# Altium PCB PD_BQ_Ref_Design_PCB.PcbDoc (part 3 of 4)
Units mil, origin at the board's own origin, x right, y up, seen from the top; angles counter-clockwise.
Board outline 2000 x 3702.76 mil, 4 copper layers (Top Layer, Signal Layer 1, Signal Layer 2, Bottom Layer), stack 61.2 mil thick; 124 components, 53 nets, 359 pads, 494 vias.
Unrouted connection lines stored in the file: 227.
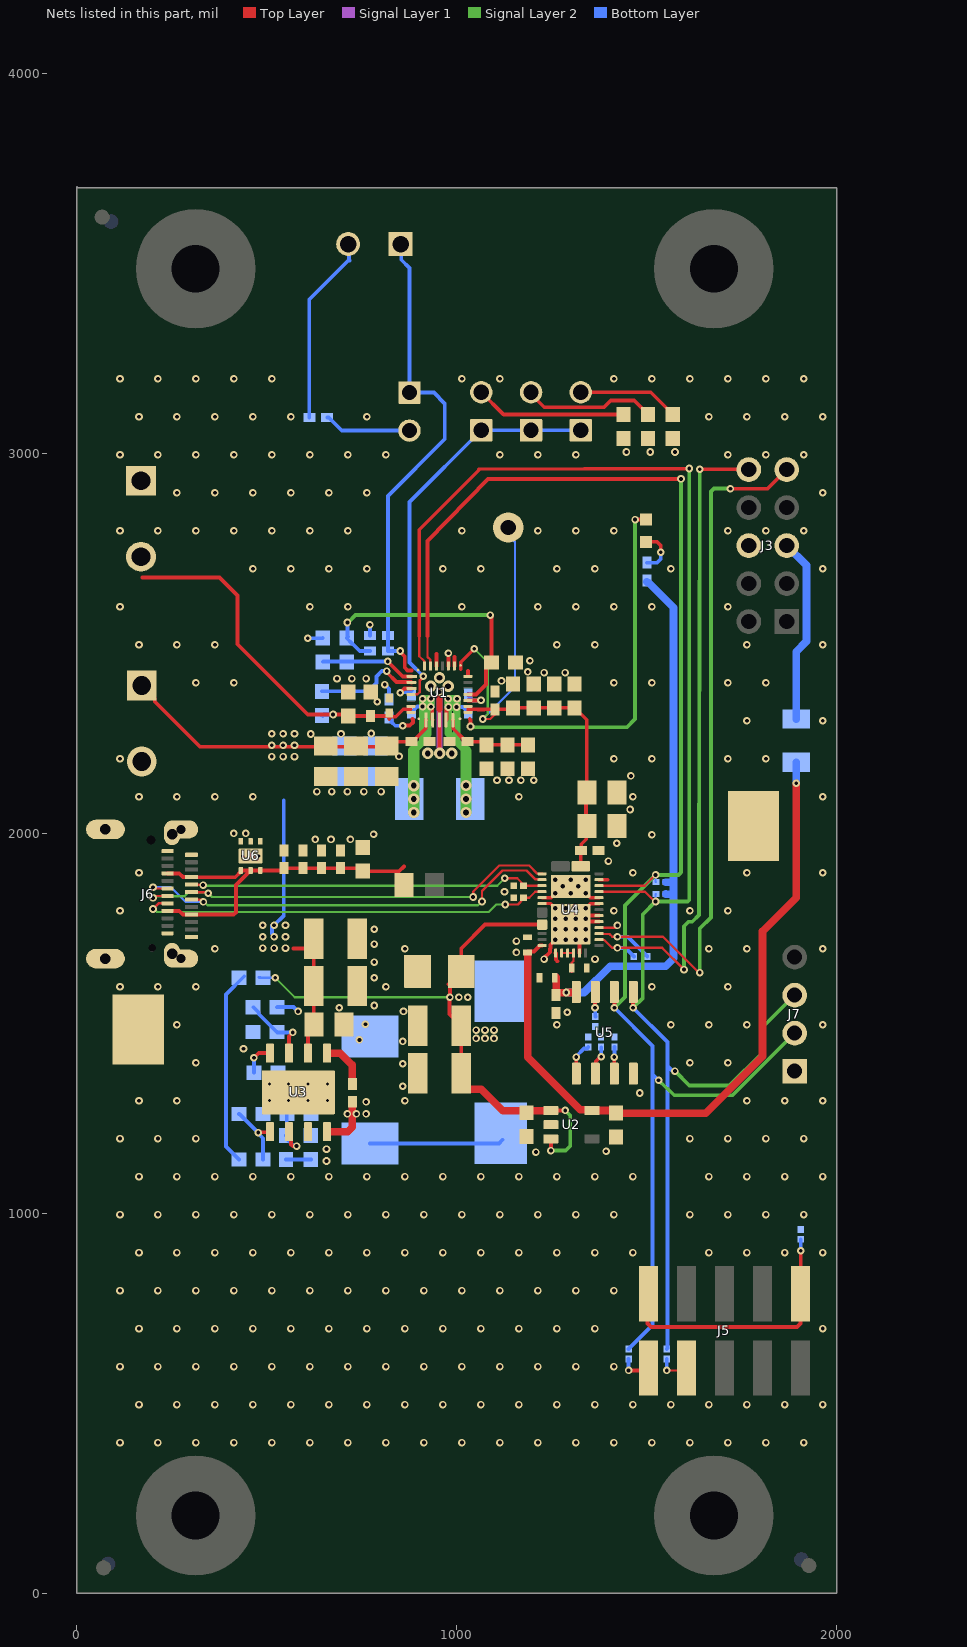
[diagram p4: the nets of this part, all layers, seen from the top]

## Part data (continued)
NT1: library part CMP-0078142-3, "Single point connection between nets.", Manufacturer=N/A, CompType=Net-Tie, MountType=SMT, PackageReference=N/A, PartNumber=N/A
R1: library part CMP-0022736-4, "RES, 100, 1%, 0.1 W, 0603", Manufacturer=Yageo, Power_W=100mW, Supplier Part Number 1=311-100HRCT-ND, TempCo="100 ppm/C", Tolerance_%=1%, Value2=0.1W, Value_Code=100R, ValueDisplayed=100, AEC Category=Q200, AEC Grade=N/A, AEC Qualified=N, ComponentLink1Description="Datasheet link", ComponentLink1URL=http://www.yageo.com/pdf/Pu-RC0603_51_PbFree_L_2.pdf, CompType=Resistor, EIA_Code=E96, MountType=SMT, PackageReference=0603, PartNumber=RC0603FR-07100RL, Res_ohm=100, RoHS=Y, SizeArea_mm2=1.28, SizeAreaWB_mm2=4.68, SizeX_mm=1.6, SizeY_mm=0.8, SizeZ_mm=1, Supplier 1=Digi-Key, Supplier 2=Mouser, Supplier 3=Farnell, Supplier Part Number 2=603-RC0603FR-07100RL, Supplier Part Number 3=9238360, Technology="Thick Film", Value1=1%, VDC_V=75V
R2: library part CMP-0026232-2, "RES, 2.21 k, 1%, 0.063 W, AEC-Q200 Grade 0, 0402", Manufacturer=Vishay-Dale, Power_W=63mW, Supplier Part Number 1=541-2.21KLCT-ND, TempCo="100 ppm/C", Tolerance_%=1%, Value2=0.063W, Value_Code=2k21, ValueDisplayed=2.21k, AEC Category=Q200, AEC Grade=0, AEC Qualified=Y, ComponentLink1Description="Datasheet link", ComponentLink1URL=http://www.vishay.com/docs/20035/dcrcwe3.pdf, CompType=Resistor, EIA_Code=E96, MountType=SMT, PackageReference=0402, PartNumber=CRCW04022K21FKED, Res_ohm=2.21k, RoHS=E, SizeArea_mm2=0.5, SizeX_mm=1, SizeY_mm=0.5, SizeZ_mm=0.6, Supplier 1=Digi-Key, Supplier 2=Newark, Supplier 3=Mouser, Supplier Part Number 2=52K6795, Supplier Part Number 3=71-CRCW0402-2.21K-E3, Technology="Thick Film", Value1=1%, VDC_V=50V
R3: library part CMP-0026464-2, "RES, 5.23 k, 1%, 0.063 W, AEC-Q200 Grade 0, 0402", Manufacturer=Vishay-Dale, PartNumber=CRCW04025K23FKED, Power_W=63mW, Supplier Part Number 1=541-5.23KLCT-ND, TempCo="100 ppm/C", Tolerance_%=1%, Value2=0.063W, Value_Code=5k23, ValueDisplayed=5.23k, AEC Category=Q200, AEC Grade=0, AEC Qualified=Y, ComponentLink1Description="Datasheet link", ComponentLink1URL=http://www.vishay.com/docs/20035/dcrcwe3.pdf, CompType=Resistor, EIA_Code=E96, MountType=SMT, PackageReference=0402, Res_ohm=5.23k, RoHS=E, SizeArea_mm2=0.5, SizeX_mm=1, SizeY_mm=0.5, SizeZ_mm=0.6, Supplier 1=Digi-Key, Supplier 2=Newark, Supplier 3=Mouser, Supplier Part Number 2=52K7121, Supplier Part Number 3=71-CRCW0402-5.23K-E3, Technology="Thick Film", Value1=1%, VDC_V=50V
R4: library part CMP-0022788-4, "RES, 137 k, 1%, 0.1 W, 0603", Manufacturer=Yageo, Power_W=100mW, Supplier Part Number 1=311-137KHRCT-ND, TempCo="100 ppm/C", Tolerance_%=1%, Value2=0.1W, Value_Code=137k, AEC Category=Q200, AEC Grade=N/A, AEC Qualified=N, ComponentLink1Description="Datasheet link", ComponentLink1URL=http://www.yageo.com/pdf/Pu-RC0603_51_PbFree_L_2.pdf, CompType=Resistor, EIA_Code=E96, MountType=SMT, PackageReference=0603, PartNumber=RC0603FR-07137KL, Res_ohm=137k, RoHS=Y, SizeArea_mm2=1.28, SizeAreaWB_mm2=4.68, SizeX_mm=1.6, SizeY_mm=0.8, SizeZ_mm=1, Supplier 1=Digi-Key, Supplier 2=Mouser, Supplier 3=Farnell, Supplier Part Number 2=603-RC0603FR-07137KL, Supplier Part Number 3=1799325, Technology="Thick Film", Value1=1%, ValueDisplayed=137k, VDC_V=75V
R5: library part CMP-0026284-2, "RES, 30.1 k, 1%, 0.063 W, AEC-Q200 Grade 0, 0402", Manufacturer=Vishay-Dale, PartNumber=CRCW040230K1FKED, Power_W=63mW, Supplier Part Number 1=541-30.1KLCT-ND, TempCo="100 ppm/C", Tolerance_%=1%, Value2=0.063W, Value_Code=30k1, ValueDisplayed=30.1k, AEC Category=Q200, AEC Grade=0, AEC Qualified=Y, ComponentLink1Description="Datasheet link", ComponentLink1URL=http://www.vishay.com/docs/20035/dcrcwe3.pdf, CompType=Resistor, EIA_Code=E96, MountType=SMT, PackageReference=0402, Res_ohm=30.1k, RoHS=E, SizeArea_mm2=0.5, SizeX_mm=1, SizeY_mm=0.5, SizeZ_mm=0.6, Supplier 1=Digi-Key, Supplier 2=Newark, Supplier 3=Mouser, Supplier Part Number 2=52K6954, Supplier Part Number 3=71-CRCW0402-30.1K-E3, Technology="Thick Film", Value1=1%, VDC_V=50V
R6: library part CMP-0022735-5, "RES, 100 k, 1%, 0.1 W, 0603", Manufacturer=Yageo, Power_W=100mW, Supplier Part Number 1=311-100KHRCT-ND, TempCo="100 ppm/C", Tolerance_%=1%, Value2=0.1W, Value_Code=100k, AEC Category=Q200, AEC Grade=N/A, AEC Qualified=N, ComponentLink1Description="Datasheet link", ComponentLink1URL=http://www.yageo.com/pdf/Pu-RC0603_51_PbFree_L_2.pdf, CompType=Resistor, EIA_Code=E96, MountType=SMT, PackageReference=0603, PartNumber=RC0603FR-07100KL, Res_ohm=100k, RoHS=Y, SizeArea_mm2=1.28, SizeAreaWB_mm2=4.68, SizeX_mm=1.6, SizeY_mm=0.8, SizeZ_mm=1, Supplier 1=Digi-Key, Supplier 2=Mouser, Supplier 3=Farnell, Supplier Part Number 2=603-RC0603FR-07100KL, Supplier Part Number 3=9238727, Technology="Thick Film", Value1=1%, ValueDisplayed=100k, VDC_V=75V
R7: library part CMP-0025958-3, "RES, 10.0 k, 1%, 0.063 W, AEC-Q200 Grade 0, 0402", Manufacturer=Vishay-Dale, PartNumber=CRCW040210K0FKED, Power_W=63mW, Supplier Part Number 1=541-10.0KLCT-ND, TempCo="100 ppm/C", Tolerance_%=1%, Value2=0.063W, Value_Code=10k0, ValueDisplayed=10.0k, AEC Category=Q200, AEC Grade=0, AEC Qualified=Y, ComponentLink1Description="Datasheet link", ComponentLink1URL=http://www.vishay.com/docs/20035/dcrcwe3.pdf, CompType=Resistor, EIA_Code=E96, MountType=SMT, PackageReference=0402, Res_ohm=10k, RoHS=E, SizeArea_mm2=0.5, SizeX_mm=1, SizeY_mm=0.5, SizeZ_mm=0.6, Supplier 1=Digi-Key, Supplier 2=Newark, Supplier 3=Mouser, Supplier Part Number 2=52K6595, Supplier Part Number 3=71-CRCW0402-10K-E3, Technology="Thick Film", Value1=1%, VDC_V=50V
R8: library part CMP-0023246-5, "RES, 6.04 k, 1%, 0.1 W, 0603", Manufacturer=Yageo, Power_W=100mW, Supplier Part Number 1=311-6.04KHRCT-ND, TempCo="100 ppm/C", Tolerance_%=1%, Value2=0.1W, Value_Code=6k04, ValueDisplayed=6.04k, AEC Category=Q200, AEC Grade=N/A, AEC Qualified=N, ComponentLink1Description="Datasheet link", ComponentLink1URL=http://www.yageo.com/pdf/Pu-RC0603_51_PbFree_L_2.pdf, CompType=Resistor, EIA_Code=E96, MountType=SMT, PackageReference=0603, PartNumber=RC0603FR-076K04L, Res_ohm=6.04k, RoHS=Y, SizeArea_mm2=1.28, SizeAreaWB_mm2=4.68, SizeX_mm=1.6, SizeY_mm=0.8, SizeZ_mm=1, Supplier 1=Digi-Key, Supplier 2=Mouser, Supplier 3=Farnell, Supplier Part Number 2=603-RC0603FR-076K04L, Supplier Part Number 3=9238581, Technology="Thick Film", Value1=1%, VDC_V=75V
R9: library part CMP-0022000-4, "RES, 10.5 k, 1%, 0.1 W, AEC-Q200 Grade 0, 0603", Manufacturer=Vishay-Dale, Power_W=100mW, Supplier Part Number 1=541-10.5KHCT-ND, TempCo="100 ppm/C", Tolerance_%=1%, Value2=0.1W, Value_Code=10k5, ValueDisplayed=10.5k, AEC Category=Q200, AEC Grade=0, AEC Qualified=Y, ComponentLink1Description="Datasheet link", ComponentLink1URL=http://www.vishay.com/docs/20035/dcrcwe3.pdf, CompType=Resistor, EIA_Code=E96, MountType=SMT, PackageReference=0603, PartNumber=CRCW060310K5FKEA, Res_ohm=10.5k, RoHS=E, SizeArea_mm2=1.28, SizeX_mm=1.6, SizeY_mm=0.8, SizeZ_mm=1, Supplier 1=Digi-Key, Supplier 2=Newark, Supplier 3=Mouser, Supplier Part Number 2=52K8068, Supplier Part Number 3=71-CRCW0603-10.5K-E3, Technology="Thick Film", Value1=1%, VDC_V=75V
R10: library part CMP-0022089-4, "RES, 17.4 k, 1%, 0.1 W, AEC-Q200 Grade 0, 0603", Manufacturer=Vishay-Dale, Power_W=100mW, Supplier Part Number 1=541-17.4KHCT-ND, TempCo="100 ppm/C", Tolerance_%=1%, Value2=0.1W, Value_Code=17k4, ValueDisplayed=17.4k, AEC Category=Q200, AEC Grade=0, AEC Qualified=Y, ComponentLink1Description="Datasheet link", ComponentLink1URL=http://www.vishay.com/docs/20035/dcrcwe3.pdf, CompType=Resistor, EIA_Code=E96, MountType=SMT, PackageReference=0603, PartNumber=CRCW060317K4FKEA, Res_ohm=17.4k, RoHS=E, SizeArea_mm2=1.28, SizeX_mm=1.6, SizeY_mm=0.8, SizeZ_mm=1, Supplier 1=Digi-Key, Supplier 2=Newark, Supplier 3=Mouser, Supplier Part Number 2=52K8186, Supplier Part Number 3=71-CRCW0603-17.4K-E3, Technology="Thick Film", Value1=1%, VDC_V=75V
R11: library part CMP-0017299-3, "RES, 10.0, 1%, 0.25 W, AEC-Q200 Grade 0, 1206", Manufacturer=Panasonic, Power_W=250mW, Supplier Part Number 1=P10.0FCT-ND, TempCo="100 ppm/C", Tolerance_%=1%, Value2=0.25W, Value_Code=10R0, ValueDisplayed=10.0, AEC Category=Q200, AEC Grade=0, AEC Qualified=Y, ComponentLink1Description="Datasheet link", ComponentLink1URL=https://industrial.panasonic.com/cdbs/www-data/pdf/RDA0000/AOA0000C304.pdf, CompType=Resistor, EIA_Code=E96, MountType=SMT, PackageReference=1206, PartNumber=ERJ-8ENF10R0V, Res_ohm=10, RoHS=Y, SizeArea_mm2=5.12, SizeAreaWB_mm2=10.92, SizeX_mm=3.2, SizeY_mm=1.6, SizeZ_mm=1.35, Supplier 1=Digi-Key, Supplier 2=Farnell, Supplier Part Number 2=1748406, Technology="Thick Film", Value1=1%, VDC_V=200V
R12: library part CMP-0022483-4, "RES, 51.1, 1%, 0.1 W, AEC-Q200 Grade 0, 0603", Manufacturer=Vishay-Dale, Power_W=100mW, Supplier Part Number 1=541-51.1HCT-ND, TempCo="100 ppm/C", Tolerance_%=1%, Value2=0.1W, Value_Code=51R1, ValueDisplayed=51.1, AEC Category=Q200, AEC Grade=0, AEC Qualified=Y, ComponentLink1Description="Datasheet link", ComponentLink1URL=http://www.vishay.com/docs/20035/dcrcwe3.pdf, CompType=Resistor, EIA_Code=E96, MountType=SMT, PackageReference=0603, PartNumber=CRCW060351R1FKEA, Res_ohm=51.1, RoHS=E, SizeArea_mm2=1.28, SizeX_mm=1.6, SizeY_mm=0.8, SizeZ_mm=1, Supplier 1=Digi-Key, Supplier 2=Newark, Supplier 3=Mouser, Supplier Part Number 2=52K8594, Supplier Part Number 3=71-CRCW0603-51.1-E3, Technology="Thick Film", Value1=1%, VDC_V=75V
R13: library part CMP-0022546-4, "RES, 665 k, 1%, 0.1 W, AEC-Q200 Grade 0, 0603", Manufacturer=Vishay-Dale, Power_W=100mW, Supplier Part Number 1=541-665KHCT-ND, TempCo="100 ppm/C", Tolerance_%=1%, Value2=0.1W, Value_Code=665k, AEC Category=Q200, AEC Grade=0, AEC Qualified=Y, ComponentLink1Description="Datasheet link", ComponentLink1URL=http://www.vishay.com/docs/20035/dcrcwe3.pdf, CompType=Resistor, EIA_Code=E96, MountType=SMT, PackageReference=0603, PartNumber=CRCW0603665KFKEA, Res_ohm=665k, RoHS=E, SizeArea_mm2=1.28, SizeX_mm=1.6, SizeY_mm=0.8, SizeZ_mm=1, Supplier 1=Digi-Key, Supplier 2=Mouser, Supplier 3=Farnell, Supplier Part Number 2=71-CRCW0603-665K-E3, Supplier Part Number 3=1157478, Technology="Thick Film", Value1=1%, ValueDisplayed=665k, VDC_V=75V
R14: library part CMP-0021999-4, "RES, 10.2 k, 1%, 0.1 W, AEC-Q200 Grade 0, 0603", Manufacturer=Vishay-Dale, Power_W=100mW, Supplier Part Number 1=541-10.2KHCT-ND, TempCo="100 ppm/C", Tolerance_%=1%, Value2=0.1W, Value_Code=10k2, ValueDisplayed=10.2k, AEC Category=Q200, AEC Grade=0, AEC Qualified=Y, ComponentLink1Description="Datasheet link", ComponentLink1URL=http://www.vishay.com/docs/20035/dcrcwe3.pdf, CompType=Resistor, EIA_Code=E96, MountType=SMT, PackageReference=0603, PartNumber=CRCW060310K2FKEA, Res_ohm=10.2k, RoHS=E, SizeArea_mm2=1.28, SizeX_mm=1.6, SizeY_mm=0.8, SizeZ_mm=1, Supplier 1=Digi-Key, Supplier 2=Newark, Supplier 3=Mouser, Supplier Part Number 2=52K8067, Supplier Part Number 3=71-CRCW0603-10.2K-E3, Technology="Thick Film", Value1=1%, VDC_V=75V
R15: library part CMP-0022036-4, "RES, 130 k, 1%, 0.1 W, AEC-Q200 Grade 0, 0603", Manufacturer=Vishay-Dale, Power_W=100mW, Supplier Part Number 1=541-130KHCT-ND, TempCo="100 ppm/C", Tolerance_%=1%, Value2=0.1W, Value_Code=130k, AEC Category=Q200, AEC Grade=0, AEC Qualified=Y, ComponentLink1Description="Datasheet link", ComponentLink1URL=http://www.vishay.com/docs/20035/dcrcwe3.pdf, CompType=Resistor, EIA_Code=E96, MountType=SMT, PackageReference=0603, PartNumber=CRCW0603130KFKEA, Res_ohm=130k, RoHS=E, SizeArea_mm2=1.28, SizeX_mm=1.6, SizeY_mm=0.8, SizeZ_mm=1, Supplier 1=Digi-Key, Supplier 2=Newark, Supplier 3=Mouser, Supplier Part Number 2=52K8127, Supplier Part Number 3=71-CRCW0603-130K-E3, Technology="Thick Film", Value1=1%, ValueDisplayed=130k, VDC_V=75V
R16: library part CMP-0022137-4, "RES, 1.96 k, 1%, 0.1 W, AEC-Q200 Grade 0, 0603", Manufacturer=Vishay-Dale, Power_W=100mW, Supplier Part Number 1=541-1.96KHCT-ND, TempCo="100 ppm/C", Tolerance_%=1%, Value2=0.1W, Value_Code=1k96, ValueDisplayed=1.96k, AEC Category=Q200, AEC Grade=0, AEC Qualified=Y, ComponentLink1Description="Datasheet link", ComponentLink1URL=http://www.vishay.com/docs/20035/dcrcwe3.pdf, CompType=Resistor, EIA_Code=E96, MountType=SMT, PackageReference=0603, PartNumber=CRCW06031K96FKEA, Res_ohm=1.96k, RoHS=E, SizeArea_mm2=1.28, SizeX_mm=1.6, SizeY_mm=0.8, SizeZ_mm=1, Supplier 1=Digi-Key, Supplier 2=Newark, Supplier 3=Mouser, Supplier Part Number 2=52K8051, Supplier Part Number 3=71-CRCW0603-1.96K-E3, Technology="Thick Film", Value1=1%, VDC_V=75V
R17: library part CMP-0022360-4, "RES, 37.4 k, 1%, 0.1 W, AEC-Q200 Grade 0, 0603", Manufacturer=Vishay-Dale, Power_W=100mW, Supplier Part Number 1=541-37.4KHCT-ND, TempCo="100 ppm/C", Tolerance_%=1%, Value2=0.1W, Value_Code=37k4, ValueDisplayed=37.4k, AEC Category=Q200, AEC Grade=0, AEC Qualified=Y, ComponentLink1Description="Datasheet link", ComponentLink1URL=http://www.vishay.com/docs/20035/dcrcwe3.pdf, CompType=Resistor, EIA_Code=E96, MountType=SMT, PackageReference=0603, PartNumber=CRCW060337K4FKEA, Res_ohm=37.4k, RoHS=E, SizeArea_mm2=1.28, SizeX_mm=1.6, SizeY_mm=0.8, SizeZ_mm=1, Supplier 1=Digi-Key, Supplier 2=Newark, Supplier 3=Mouser, Supplier Part Number 2=52K8462, Supplier Part Number 3=71-CRCW0603-37.4K-E3, Technology="Thick Film", Value1=1%, VDC_V=75V
R21 R22 R24 R25: library part CMP-0027272-3, "RES, 2.20 k, 1%, 0.05 W, 0201", Manufacturer=Vishay-Dale, Power_W=50mW, Supplier Part Number 1=541-2.20KAABCT-ND, TempCo="100 ppm/C", Tolerance_%=1%, Value2=0.05W, Value_Code=2k20, ValueDisplayed=2.20k, AEC Category=Q200, AEC Grade=N/A, AEC Qualified=N, ComponentLink1Description="Datasheet link", ComponentLink1URL=http://www.vishay.com/docs/20052/crcw0201e3.pdf, CompType=Resistor, MountType=SMT, PackageReference=0201, PartNumber=CRCW02012K20FKED, Res_ohm=2.2k, RoHS=E, SizeArea_mm2=0.18, SizeX_mm=0.6, SizeY_mm=0.3, SizeZ_mm=0.26, Supplier 1=Digi-Key, Supplier 2=Newark, Supplier 3=Mouser, Supplier Part Number 2=01X1849, Supplier Part Number 3=71-CRCW02012K20FKED, Technology="Thick Film", Value1=1%, VDC_V=30V
R26 R27 R29: library part CMP-0027008-4, "RES, 0, 5%, 0.05 W, 0201", Manufacturer=Vishay-Dale, Power_W=50mW, Supplier Part Number 1=72M6743, TempCo=ppm/C, Tolerance_%=5%, Value2=0.05W, Value_Code=0000, ValueDisplayed=0, AEC Category=Q200, AEC Grade=N/A, AEC Qualified=N, ComponentLink1Description="Datasheet link", ComponentLink1URL=http://www.vishay.com/docs/20052/crcw0201e3.pdf, CompType=Resistor, EIA_Code=E24, MountType=SMT, PackageReference=0201, PartNumber=CRCW02010000Z0ED, Res_ohm=0, RoHS=E, SizeArea_mm2=0.18, SizeX_mm=0.6, SizeY_mm=0.3, SizeZ_mm=0.26, Supplier 1=Newark, Technology="Thick Film", Value1=5%
R28 R30 R31 R32: library part CMP-0027262-3, "RES, 10.0 k, 1%, 0.05 W, 0201", Manufacturer=Vishay-Dale, Power_W=50mW, Supplier Part Number 1=541-10.0KAABCT-ND, TempCo="100 ppm/C", Tolerance_%=1%, Value2=0.05W, Value_Code=10k0, ValueDisplayed=10.0k, AEC Category=Q200, AEC Grade=N/A, AEC Qualified=N, ComponentLink1Description="Datasheet link", ComponentLink1URL=http://www.vishay.com/docs/20052/crcw0201e3.pdf, CompType=Resistor, EIA_Code=E96, MountType=SMT, PackageReference=0201, PartNumber=CRCW020110K0FKED, Res_ohm=10k, RoHS=E, SizeArea_mm2=0.18, SizeX_mm=0.6, SizeY_mm=0.3, SizeZ_mm=0.26, Supplier 1=Digi-Key, Supplier 2=Newark, Supplier 3=Mouser, Supplier Part Number 2=71R4422, Supplier Part Number 3=71-CRCW020110K0FKED, Technology="Thick Film", Value1=1%, VDC_V=30V
SH-J1 SH-J2: library part CMP-0003623-1, "Shunt, 100mil, Gold plated, Black", Alternate Manufacturer=3M, Alternate PartNumber=969102-0000-DA, Manufacturer=Samtec, Supplier Part Number 1=SNT-100-BK-G-ND, ClassName=Shunt, ComponentLink1Description="Datasheet Link", ComponentLink1URL=http://www.samtec.com/ftppub/pdf/SNT.PDF, CompType=Shunt, Key=SNT-100-BK-G, LatestRevisionDate=2017-03-09, MountType=N/A, Note="You can \"mate\" this to a header by matching the designator.  i.e. use SH-J3 for header J3", PackageReference=Shunt, PartNumber=SNT-100-BK-G, Publisher="Texas Instruments", RoHS=Y, Supplier 1=Digi-Key
TP1: library part CMP-0055137-1, "Test Point, Miniature, Red, TH", Color=Red, Manufacturer=Keystone, Supplier Part Number 1=36-5000-ND, CNHeader=FALSE, ComponentLink1Description="Datasheet URL", ComponentLink1URL=http://www.keyelco.com/userAssets/file/M60-2p60.pdf, CompType="Test Point", ContactFinish=Silver, CT=TRUE, Green_EU RoHS=Passed, Green_EU RoHS-2=Incomplete, Green_Lifecycle=Active, Green_REACh=Passed, LatestRevisionDate=26/05/2017, MountType=TH, PackageReference="Red Miniature Testpoint", PartNumber=5000, Publisher="Texas Instruments", RoHS=Y, Supplier 1=Digi-Key, Supplier 2=Mouser, Supplier Part Number 2=534-5000
TP2 TP3: library part CMP-0055153-1, "Test Point, Compact, SMT", Manufacturer=Keystone, Supplier Part Number 1=36-5016TR-ND, CNHeader=FALSE, ComponentLink1Description="Datasheet URL", ComponentLink1URL=http://www.keyelco.com/userAssets/store/files/5016.PDF, CompType="Test Point", CT=TRUE, Green_EU RoHS=Passed, Green_EU RoHS-2=Incomplete, Green_Lifecycle=Active, Green_REACh=Passed, LatestRevisionDate=26/05/2017, MountType=SMT, PackageReference=Testpoint_Keystone_Compact, PartNumber=5016, Publisher="Texas Instruments", RoHS=Y, Supplier 1=Digi-Key, Supplier 2=Mouser, Supplier Part Number 2=534-5016
U1: library part CMP-0088656-1, "BQ2579x HotRod", Manufacturer="Texas Instruments", Operating Temperature Range=to, Datasheet Path=datasheets/IC-BQ25792RQM.pdf, helpURL=https://upverter.com/upn/revision/94d0648e55e6c5c0/, PackageReference=VQFN-HR29, Part Number=BQ25792RQM, PartNumber=BQ25792RQM, RoHS=UNKNOWN, SizeZ_mm=1mm, Standoff Height=0mm
U2: library part CMP-0074640-3, "500-mA, Low IQ, Small Size, Low Dropout Regulator, DBV0005A (SOT-23-5)", Alternate Manufacturer="Texas Instruments", AEC Category=Q200, AEC Qualified=N, ComponentLink1Description="Datasheet Link", ComponentLink1URL=http://www.ti.com/lit/ds/symlink/tlv755p.pdf, ComponentLink2Description="Product Folder", ComponentLink2URL=http://www.ti.com/product/tlv755p, ComponentLink3Description="Online Datasheet", ComponentLink3URL=http://www.ti.com/product/tlv755p/datasheet, CompType=IC, Manufacturer="Texas Instruments", MountType=SMT, PackageDescription=SOT-23-5, PackageReference=DBV0005A, PartNumber=TLV75533PDBVR, SizeArea_mm2=8.12, SizeAreaWB_mm2=14.82, SizeX_mm=2.8, SizeY_mm=2.9, SizeZ_mm=1.45
U3: library part CMP-0067056-2, "3.5V to 28V Input, 5A, 570kHz Step-Down Converter with Eco-mode, DDA0008E (SOIC-8)", Alternate Manufacturer="Texas Instruments", Alternate PartNumber=TPS54531DDA, ComponentLink1Description="Datasheet Link", ComponentLink1URL=http://www.ti.com/lit/ds/symlink/tps54531.pdf, CompType=IC, Green_EU RoHS=Passed, Green_EU RoHS-2=Passed, Green_Lifecycle=Active, Green_REACh=Passed, LatestRevisionDate=2017-06-09, Manufacturer="Texas Instruments", MountType=SMT, PackageDescription=SOIC-8, PackageReference=DDA0008E, PartNumber=TPS54531DDAR, Publisher="Texas Instruments", RoHS=Y, SizeArea_mm2=31.0, SizeAreaWB_mm2=57.4, SizeX_mm=5.0, SizeY_mm=6.2, SizeZ_mm=1.7, U/M=EA
U4: library part CMP-0090338-5, "USB Type-C and USB PD Controller with Integrated Power Switches Optimized for Power Applications", Manufacturer="Texas Instruments", Max Supply Voltage=22V, Min Supply Voltage=3V, Operating Temperature Range="-40°C to +125°C", AEC Category=Q200, AEC Qualified=No, ComponentLink1Description="Datasheet Link", ComponentLink1URL=http://www.ti.com/lit/ds/symlink/GPN.pdf, ComponentLink2Description="Product Folder", ComponentLink2URL=http://www.ti.com/product/GPN, ComponentLink3Description="Online Datasheet", ComponentLink3URL=http://www.ti.com/product/GPN/datasheet, CompType=IC, Datasheet Path=datasheets/IC-TPS25750DRJK.pdf, helpURL=https://upverter.com/upn/revision/5be88369cac593dc/, Number Of Ports=1, PackageReference=VQFN32, Part Number=TPS25750DRJK, PartNumber=TPS25750DRJK, RoHS=UNKNOWN, SizeZ_mm=0.8mm, Standoff Height=0mm, TaMax_C=+105°C, TaMin_C=-40°C, Tjmax_C=+175°C, Usb Standard="USB 3.0"
U5: library part CMP-0005314-2, "256 kb I2C CMOS Serial EEPROM, SOIC-8", Manufacturer="ON Semiconductor", Supplier Part Number 1=CAT24C256WI-G-ND, ComponentLink1Description="Datasheet URL", ComponentLink1URL=http://www.onsemi.com/pub_link/Collateral/CAT24C256-D.PDF, LatestRevisionDate=09/03/2017, MountType=SMT, PackageReference=SOIC-8, PartNumber=CAT24C256WI-G, Publisher="Texas Instruments", RoHS=Y, SizeArea_mm2=29.351, SizeAreaWB_mm2=55.131, SizeX_mm=5.99, SizeY_mm=4.9, SizeZ_mm=1.75, Supplier 1=Digi-Key, Supplier 2=Newark, Supplier 3=Mouser, Supplier Part Number 2=06R0552, Supplier Part Number 3=698-CAT24C256WI-G
U6: library part CMP-0077834-1, "22-V Precision Surge Protection Clamp, DRV0006A (WSON-6)", Alternate Manufacturer="Texas Instruments", AEC Category=Q200, AEC Qualified=N, ComponentLink1Description="Datasheet Link", ComponentLink1URL=http://www.ti.com/lit/ds/symlink/tvs3300.pdf, ComponentLink2Description="Product Folder", ComponentLink2URL=TBD, CompType=IC, Manufacturer="Texas Instruments", MountType=SMT, PackageDescription=WSON-6, PackageReference=DRV0006A, PartNumber=TVS2200DRVR, SizeArea_mm2=4.0, SizeAreaWB_mm2=9.0, SizeX_mm=2.0, SizeY_mm=2.0, SizeZ_mm=0.8
ZZ1: library part CMP-0003616-3, ClassName=AssemblyNote, CompType=AssemblyNote, Key=AssemblyNoteLabel, LatestRevisionDate=2017-03-09, Publisher="Texas Instruments"

## Via types
v1: diameter 20, hole 10, Top Layer to Bottom Layer, tented both sides, 445 vias
v2: diameter 23.62, hole 11.81, Top Layer to Bottom Layer, 24 vias
v3: diameter 30, hole 15, Top Layer to Bottom Layer, tented both sides, 12 vias
v4: diameter 19.68, hole 7.87, Top Layer to Bottom Layer, tented both sides, 10 vias
v5: diameter 20, hole 10, Top Layer to Bottom Layer, 3 vias

## Nets (pads, with @x,y where several pads share a name; then routed paths per layer and width w, separated by ;. In a path a pad name is that pad's centre, name@x,y a point inside that pad or via, vN(x,y) a via of type N, cw(c..) or ccw(c..) an arc to the next point about the centre after c; other vN are vias at no path point)
AGND: C22.2 J3.6 J4.2 NT1.2 R5.1 R6.1 R7.1 R8.1 R9.1 R10.1 U1.10 U1.11 U1.13 | length 694.3
  Top Layer w10: 946.85,2472.44 946.97,2472.32 U1.13@946.97,2440.84 ; 978.35,2462.6 978.35,2440.96 U1.11@978.46,2440.84 ; 994.09,2464.57 994.21,2464.45 U1.10@994.21,2440.84
  Bottom Layer w10: v1(608.27,2513.78) 646.84,2513.78 R6.1@647.82,2514.76 ; R7.1@612.2,3094.49 612.2,3405.51 692.91,3486.22 693.03,3486.22 714.68,3507.87 718.5,3507.87 716.54,3509.84 716.54,3549.21 J4.2@714.57,3551.18 ; v1(771.65,2549.21) 771.65,2520.79 R5.1@771.77,2520.67 ; v1(811.02,2391.73) 821.97,2380.79 C22.2@821.97,2352.36
  other v1: 978.35,2474.41 1446.85,3003.94 1509.84,3003.94 1574.8,3003.94
BAT: C19.1 C20.1 C21.1 J2.2 R1.1 U1.22 U1.23 | length 977.6
  Top Layer w10: 173.23,2673.62 375.59,2673.62 423.23,2625.98 423.23,2498.03 608.27,2312.99 v1(674.83,2312.99) 710.75,2312.99 C21.1@714.68,2309.06 C20.1@773.74,2309.06 817.05,2309.06 822.95,2303.15 ; 822.95,2301.18 822.95,2303.15 ; 879.05,2326.77 859.37,2326.77 839.8,2307.2 827,2307.2 822.95,2303.15
  Bottom Layer w10: R1.1@645.67,2311.02 647.64,2309.06 651.57,2312.99 v1(674.83,2312.99)
C_CC1: C42.1 J6.A5 U4.28 | length 942.2
  Top Layer w6: J6.A5@302.17,1865.16 302.66,1864.67 332.19,1864.67 v1(332.68,1864.17) ; v1(1126.77,1881.89) 1159.35,1881.89 1176.38,1864.86 C42.1@1176.38,1862.2 1225.02,1862.2 U4.28@1225.2,1862.39
  Signal Layer 2 w6: v1(332.68,1864.17) 334.65,1862.2 1107.09,1862.2 v1(1126.77,1881.89)
C_CC2: C41.1 J6.B5 U4.29 | length 1095.8
  Top Layer w6: v1(200.79,1801.18) 215.55,1815.95 J6.B5@239.17,1815.95 ; v1(1127.95,1812.99) 1161.31,1812.99 1176.38,1828.06 C41.1@1176.38,1830.71 1190.94,1830.71 1206.87,1846.64 U4.29@1225.2,1846.64
  Signal Layer 2 w6: v1(200.79,1801.18) 203.43,1801.18 211.3,1793.31 1084.65,1793.31 1104.33,1812.99 v1(1127.95,1812.99)
C_USB_N: J6.A7 J6.B7 U4.27 | length 1182
  Top Layer w6: v1(200.79,1858.27) 203.74,1855.32 J6.B7@239.17,1855.32 ; J6.A7@302.17,1825.79 327.76,1825.79 v1(333.6,1819.94) ; v1(1066.93,1820.87) 1066.93,1848.43 1120.89,1902.39 1184.23,1902.39 1207.54,1879.07 1224.27,1879.07 U4.27@1225.2,1878.13
  Signal Layer 2 w6: v1(333.6,1819.94) 335.2,1819.94 344.12,1811.02 1056.41,1811.02 v1@1066.59,1821.2
  Bottom Layer w6: v1(200.79,1858.27) 248.03,1858.27 286.36,1819.94 v1(333.6,1819.94) ; v1@1066.26,1820.87 v1(1066.93,1820.87)
C_USB_P: J6.A6 J6.B6 U4.26 | length 1175.4
  Top Layer w6: v1(200.79,1830.27) 204.58,1830.27 209.94,1835.63 J6.B6@239.17,1835.63 ; J6.A6@302.17,1845.47 339.72,1845.47 342.67,1842.52 v1(346.46,1842.52) ; v1(1043.31,1832.68) 1043.85,1833.22 1043.85,1847 1112.2,1915.35 1190.95,1915.35 1211.48,1894.82 1224.27,1894.82 U4.26@1225.2,1893.88
  Signal Layer 2 w6: v1(200.79,1830.27) 204.58,1830.27 208.95,1834.65 283.46,1834.65 294.29,1845.47 335.94,1845.47 336.22,1845.2 343.78,1845.2 v1(346.46,1842.52) ; v1@344.98,1844 356.3,1832.68 v1(1043.31,1832.68)
GND: C2.1 C3.1 C4.1 C5.1 C6.2 C8.1 C9.1 C10.1 C11.2 C12.2 C13.2 C14.2 C15.2 C16.2 C17.2 C18.2 C19.2 C20.2 C21.2 C23.1 C24.1 C26.2 C27.2 C28.2 C29.2 C30.2 C31.2 C33.2 C34.2 C35.2 C36.2 C37.2 C38.2 C39.2 C40.2 C41.2 C42.2 C43.2 C44.2 C45.1 C46.1 C47.1 C48.1 D2.2 J1.2 J2.1 J6.A1 J6.A12 J6.B1 J6.B12 J6.S1 J6.S2 J6.S3 J6.S4 J7.1 NT1.1 R15.1 R16.1 R17.1 R28.1 R29.1 R30.1 R31.1 R32.1 TP2.1 TP3.1 U1.27 U2.2 U3.7 U3.9@583.66,1318.62 U4.5 U4.10 U4.11 U4.12 U4.14 U4.18 U4.31 U4.39 U5.4 U6.1 U6.2 U6.3 U6.7@457.68,1940.94 | length 894.8
  Top Layer w6: U4.10@1374.81,1752.15 1417.5,1752.15 v1(1423.23,1757.87)
  Top Layer w8: U4.31@1225.2,1815.14 1247.65,1815.14
  Top Layer w10: 954.84,2326.77 U1.27@954.84,2299.11 954.84,2210.63 v3(955.83,2210.63) ; v1(1230.31,1669.29) 1230.31,1672 1245.64,1687.32 1245.64,1696.6 1247.02,1697.98 1247.02,1707.03 1300.01,1760.02 U4.39@1300.01,1761.4 ; 1247.65,1815.14 U4.39@1300.01,1762.78 ; U4.39@1313.59,1747.82 U4.39@1300.01,1761.4 ; U4.39@1313.59,1774.98 U4.39@1300.01,1761.4 ; U4.39@1321.56,1784.33 1352.37,1815.14 U4.14@1374.81,1815.14 ; U4.39@1322.25,1783.65 U4.12@1374.81,1783.65 U4.39@1340.17,1783.65 ; U4.5@1323.63,1685.22 U4.39@1323.63,1737.78 ; U4.39@1340.17,1767.9 U4.11@1374.81,1767.9 ; U4.18@1374.81,1878.13 1397.82,1878.13
  Top Layer w15: 954.84,2326.77 v1@954.84,2372.23
  Signal Layer 1 w15: v1(954.84,2372.26) 954.96,2372.14 954.96,2211.49 v3(955.83,2210.63)
  other v1: 113.91,396.71 213.91,396.71 313.91,396.71 413.91,396.71 513.91,396.71 613.91,396.71 713.91,396.71 813.91,396.71 913.91,396.71 1013.91,396.71 1113.91,396.71 1213.91,396.71 1313.91,396.71 1413.91,396.71 1513.91,396.71 1613.91,396.71 1713.91,396.71 1813.91,396.71 1913.91,396.71 163.91,496.71 263.91,496.71 363.91,496.71 463.91,496.71 563.91,496.71 663.91,496.71 763.91,496.71 863.91,496.71 963.91,496.71 1063.91,496.71 1163.91,496.71 1263.91,496.71 1363.91,496.71 1463.91,496.71 1563.91,496.71 1663.91,496.71 1763.91,496.71 1863.91,496.71 1963.91,496.71 113.91,596.71 213.91,596.71 313.91,596.71 413.91,596.71 513.91,596.71 613.91,596.71 713.91,596.71 813.91,596.71 913.91,596.71 1013.91,596.71 1113.91,596.71 1213.91,596.71 1313.91,596.71 1413.91,596.71 163.91,696.71 263.91,696.71 363.91,696.71 463.91,696.71 563.91,696.71 663.91,696.71 763.91,696.71 863.91,696.71 963.91,696.71 1063.91,696.71 1163.91,696.71 1263.91,696.71 1363.91,696.71 1963.91,696.71 113.91,796.71 213.91,796.71 313.91,796.71 413.91,796.71 513.91,796.71 613.91,796.71 713.91,796.71 813.91,796.71 913.91,796.71 1013.91,796.71 1113.91,796.71 1213.91,796.71 1313.91,796.71 1413.91,796.71 163.91,896.71 263.91,896.71 363.91,896.71 463.91,896.71 563.91,896.71 663.91,896.71 763.91,896.71 863.91,896.71 963.91,896.71 1063.91,896.71 1163.91,896.71 1263.91,896.71 1363.91,896.71 1463.91,896.71 1663.91,896.71 1763.91,896.71 1863.91,896.71 1963.91,896.71 113.91,996.71 213.91,996.71 313.91,996.71 413.91,996.71 513.91,996.71 613.91,996.71 713.91,996.71 813.91,996.71 913.91,996.71 1013.91,996.71 1113.91,996.71 1213.91,996.71 1313.91,996.71 1413.91,996.71 1613.91,996.71 1713.91,996.71 1813.91,996.71 1913.91,996.71 163.91,1096.71 263.91,1096.71 363.91,1096.71 463.91,1096.71 563.91,1096.71 663.91,1096.71 763.91,1096.71 863.91,1096.71 963.91,1096.71 1063.91,1096.71 1163.91,1096.71 1263.91,1096.71 1363.91,1096.71 1463.91,1096.71 1663.91,1096.71 1763.91,1096.71 1863.91,1096.71 1963.91,1096.71 657.48,1137.8 1208.66,1161.42 1393.39,1163.39 657.48,1169.29 113.91,1196.71 213.91,1196.71 313.91,1196.71 1613.91,1196.71 1713.91,1196.71 1813.91,1196.71 1913.91,1196.71 163.91,1296.71 263.91,1296.71 863.91,1296.71 1763.91,1296.71 1863.91,1296.71 1963.91,1296.71 1481.97,1316.93 858.27,1334.65 858.27,1393.7 313.91,1396.71 1613.91,1396.71 1713.91,1396.71 438.98,1433.07 858.27,1452.76 744.09,1456.69 263.91,1496.71 1263.91,1496.71 1563.91,1496.71 1663.91,1496.71 1763.91,1496.71 1963.91,1496.71 759.84,1498.03 1291.34,1529.53 860.24,1531.5 690.94,1541.34 783.46,1547.24 113.91,1596.71 213.91,1596.71 313.91,1596.71 813.91,1596.71 1513.91,1596.71 1713.91,1596.71 783.46,1620.08 783.46,1661.42 1364.17,1669.29 1157.48,1687.01 363.91,1696.71 863.91,1696.71 1663.91,1696.71 1763.91,1696.71 1963.91,1696.71 783.46,1708.66 1157.48,1716.54 783.46,1748.03 113.91,1796.71 1413.91,1796.71 1613.91,1796.71 1713.91,1796.71 1125.98,1846.46 163.91,1896.71 1463.91,1896.71 1763.91,1896.71 1963.91,1896.71 1399.61,1927.17 1421.26,1974.41 627.95,1984.25 669.29,1984.25 720.47,1984.25 1513.91,1996.71 781.5,1998.03 413.39,2000 444.88,2000 1456.69,2062.99 163.91,2096.71 263.91,2096.71 363.91,2096.71 463.91,2096.71 1163.91,2096.71 1463.91,2096.71 1963.91,2096.71 632.17,2110.23 671.26,2110.24 712.6,2110.24 755.91,2110.24 801.18,2110.24 1106.3,2139.76 1137.8,2139.76 1169.29,2139.76 1202.76,2139.76 1458.66,2151.57 113.91,2196.71 1413.91,2196.71 1513.91,2196.71 1713.91,2196.71 1813.91,2196.71 1763.91,2296.71 1963.91,2296.71 791.34,2346.46 313.91,2396.71 413.91,2396.71 1413.91,2396.71 1513.91,2396.71 1713.91,2396.71 1813.91,2396.71 1118.11,2401.57 685.04,2407.48 724.41,2407.48 761.81,2407.48 1230.31,2423.23 1285.43,2423.23 1187.01,2425.2 1192.91,2454.72 163.91,2496.71 263.91,2496.71 363.91,2496.71 1263.91,2496.71 1363.91,2496.71 1763.91,2496.71 1963.91,2496.71 113.91,2596.71 613.91,2596.71 713.91,2596.71 1013.91,2596.71 1213.91,2596.71 1313.91,2596.71 1413.91,2596.71 1513.91,2596.71 1713.91,2596.71 463.91,2696.71 563.91,2696.71 663.91,2696.71 763.91,2696.71 963.91,2696.71 1063.91,2696.71 1263.91,2696.71 1363.91,2696.71 1563.91,2696.71 1963.91,2696.71 113.91,2796.71 213.91,2796.71 313.91,2796.71 413.91,2796.71 513.91,2796.71 613.91,2796.71 713.91,2796.71 1013.91,2796.71 1213.91,2796.71 1313.91,2796.71 1413.91,2796.71 1713.91,2796.71 1813.91,2796.71 1913.91,2796.71 263.91,2896.71 363.91,2896.71 463.91,2896.71 563.91,2896.71 663.91,2896.71 763.91,2896.71 1963.91,2896.71 113.91,2996.71 213.91,2996.71 313.91,2996.71 413.91,2996.71 513.91,2996.71 613.91,2996.71 713.91,2996.71 813.91,2996.71 1113.91,2996.71 1213.91,2996.71 1313.91,2996.71 1713.91,2996.71 1813.91,2996.71 1913.91,2996.71 163.91,3096.71 263.91,3096.71 363.91,3096.71 463.91,3096.71 563.91,3096.71 763.91,3096.71 1663.91,3096.71 1763.91,3096.71 1863.91,3096.71 1963.91,3096.71 113.91,3196.71 213.91,3196.71 313.91,3196.71 413.91,3196.71 513.91,3196.71 1013.91,3196.71 1113.91,3196.71 1413.91,3196.71 1513.91,3196.71 1613.91,3196.71 1713.91,3196.71 1813.91,3196.71 1913.91,3196.71
  other v2: 1259.85,1720.06 1286.62,1720.06 1313.39,1720.06 1340.17,1720.06 1259.85,1747.62 1286.62,1747.62 1313.39,1747.62 1340.17,1747.62 1259.85,1775.18 1286.62,1775.18 1313.39,1775.18 1340.17,1775.18 1259.85,1802.74 1286.62,1802.74 1313.39,1802.74 1340.17,1802.74
  other v3: 924.33,2210.63 987.32,2210.63 932.19,2387.78 977.48,2387.8 954.83,2409.65
  other v4: 506.89,1296.97 558.07,1296.97 609.25,1296.97 660.43,1296.97 506.89,1340.28 558.07,1340.28 609.25,1340.28 660.43,1340.28 436.02,1940.94 479.33,1940.94
I2C1_SCL: J3.9 R21.1 U4.9 | length 1911.4
  Top Layer w6: U4.9@1374.81,1736.4 1375.75,1735.46 1402.44,1735.46 1409.56,1728.35 v1(1423.23,1728.35) 1543.31,1728.35 1638.78,1632.87 v5@1639.76,1631.89
  Top Layer w10: v5(1720.47,2907.48) 1818.9,2907.48 J3.9@1869.09,2957.68
  Signal Layer 2 w10: v5(1639.76,1633.86) 1639.76,1749.59 1669.29,1779.12 1669.29,2900.35 1677.17,2908.23 1719.72,2908.23 v5(1720.47,2907.48)
  Bottom Layer w10: v1(1423.23,1728.35) 1450,1728.35 R21.1@1501.97,1676.38
I2C1_SDA: J3.10 R22.1 U4.8 | length 1783.2
  Top Layer w6: U4.8@1374.81,1720.65 1375.75,1719.72 1388.55,1719.72 1409.45,1698.82 v1(1423.23,1698.82) 1541.34,1698.82 v1(1598.43,1641.73) v1@1598.43,1639.76
  Top Layer w10: v5(1639.76,2958.66) J3.10@1769.09,2957.68
  Signal Layer 2 w10: v1(1598.43,1641.73) 1598.43,1755.91 1610.24,1767.72 1620.08,1767.72 1637.8,1785.43 1639.76,2960.63 v5(1639.76,2958.66)
  Bottom Layer w10: v1(1423.23,1698.82) 1444.09,1698.82 R22.1@1466.54,1676.38
I2C_SCL: J7.2 R24.2 R26.1 U1.14 U4.17 U5.6 | length 4218
  Top Layer w6: 923.23,2519.69 923.23,2464.57 930.28,2457.51 930.28,2441.78 U1.14@931.22,2440.84 ; U4.17@1374.81,1862.39 1495.03,1862.39 v1(1523.62,1890.98)
  Top Layer w10: 923.23,2519.69 923.23,2769.69 1082.68,2933.07 v1(1590.55,2933.07) ; v1(1415.35,1541.34) U5.6@1415.35,1582.21
  Signal Layer 2 w10: v1(1415.35,1541.34) 1443.23,1569.21 1443.23,1810.59 v1(1523.62,1890.98) 1583.89,1890.98 1590.55,1897.64 v1(1590.55,2933.07) ; v1(1531.5,1350.39) 1572.83,1311.02 1726.38,1311.02 J7.2@1889.76,1474.41
  Bottom Layer w6: v1(1523.62,1890.98) 1523.62,1872.83 R24.2@1524.41,1872.05
  Bottom Layer w10: v1(1415.35,1541.34) 1515.75,1440.94 1515.75,1364.17 ; R26.1@1452.76,642.91 1452.76,643.7 1456.02,646.97 1456.11,646.97 1515.75,706.61 1515.75,1364.17 ; v1(1531.5,1350.39) 1517.72,1364.17 1515.75,1364.17
I2C_SDA: J7.3 R25.2 R27.1 U1.15 U4.16 U5.5 | length 4321.3
  Top Layer w6: 901.57,2519.69 901.57,2466.54 914.54,2453.57 914.54,2441.78 U1.15@915.47,2440.84 ; U4.16@1374.81,1846.64 1495.88,1846.64 1521.65,1820.87 v1(1523.62,1820.87)
  Top Layer w10: 901.57,2519.69 901.57,2799.21 1061.02,2958.66 ; 1059.06,2958.66 v1@1610.24,2960.63 ; v1(1464.57,1541.34) U5.5@1464.57,1582.21
  Signal Layer 2 w10: v1(1464.57,1541.34) 1490.16,1566.93 1490.16,1787.4 v1(1523.62,1820.87) 1608.27,1820.87 1612.2,1824.8 v1(1612.2,2960.63) ; v1(1574.41,1374.41) 1612.2,1336.61 1718.5,1336.61 1803.15,1421.26 1803.15,1487.8 J7.3@1889.76,1574.41
  Bottom Layer w6: v1(1523.62,1820.87) 1523.62,1839.76 R25.2@1524.41,1840.55
  Bottom Layer w10: v1(1464.57,1541.34) 1555.12,1450.79 1555.12,1387.8 ; R27.1@1553.15,642.91 1555.12,644.88 1555.12,1387.8 ; v1(1574.41,1374.41) 1568.5,1374.41 1555.12,1387.8
ILIM_HIZ: R4.1 R6.2 U1.17 | length 250.9
  Top Layer w10: v1(818.9,2452.75) 858.36,2413.29 U1.17@882.01,2413.29
  Bottom Layer w10: R6.2@647.82,2451.77 648.81,2452.76 808.58,2452.76 v1(818.9,2452.75)
LDO_1V5: C37.1 U4.2 U4.3 U4.4 | length 83
  Top Layer w6: U4.2@1276.39,1685.22 U4.3@1292.13,1685.22 U4.4@1307.88,1685.22 1307.88,1664.18 1303.15,1659.45 1303.15,1636.14 C37.1@1302.83,1635.83
LDO_3V3: C36.1 C43.1 R2.2 R21.2 R22.2 R24.1 R25.1 U4.1 U5.8 | length 1507.2
  Top Layer w10: U4.1@1260.64,1685.22 1261.7,1684.16 1261.7,1667.43 1265.75,1663.39
  Top Layer w20: C43.1@1261.81,1574.8 1261.81,1578.74 C43.1@1263.62,1580.55 ; C36.1@1261.81,1620.91 1261.81,1580.55 C43.1@1263.62,1580.55 ; U5.8@1314.96,1582.6 1313.7,1581.34 v1(1288.67,1581.34) 1288.04,1580.71 1275.34,1580.71 1275.18,1580.55 C43.1@1263.62,1580.55
  Bottom Layer w20: v1@1289.37,1581.34 1335.28,1581.34 1404.33,1650.39 1474.41,1650.39 1503.94,1650.39 1533.46,1650.39 1550,1650.39 1570.87,1671.26 1570.87,1840.06 ; R2.2@1500,2662.4 1502.8,2659.61 1505.75,2659.61 1570.87,2594.49 1570.87,1872.62 ; R25.1@1550.39,1840.55 1550.89,1840.06 1570.87,1840.06 ; R24.1@1550.39,1872.05 1570.29,1872.05 1570.87,1872.62 ; 1570.87,1840.06 1570.87,1872.62
NetC1_1: C1.1 U1.4 | length 76.9
  Top Layer w10: U1.4@1029.65,2350.29 1063.99,2350.29 v1(1064.09,2350.39)
  Bottom Layer w10: C1.1@1030.63,2366.14 1030.63,2362.2 1042.54,2350.29 1063.99,2350.29 v1(1064.09,2350.39)
NetC1_2: C1.2 L1.1 U1.28 | length 640.5
  Top Layer w10: U1.28@972.56,2299.11 973.62,2300.18 973.62,2327.95 v1(978.35,2332.68)
  Signal Layer 2 w20: 1024.72,2216.54 1000.33,2240.93 ; v1(978.35,2332.68) 978.35,2353.46 v1(977.48,2354.33) v1(1001.1,2354.33) 1000,2353.23 v1(1000,2332.68) ; v1(978.35,2332.68) v1(1000,2332.68) ; v1(978.35,2332.68) 978.35,2264.68 977.46,2263.8 1000.33,2240.93 ; v1(1000,2332.68) 1000.33,2332.35 1000.33,2240.93
  Signal Layer 2 w30: v3(1024.72,2055.12) 1024.72,2216.54
  Bottom Layer w10: v1(1000,2332.68) 1016.85,2332.68 C1.2@1030.63,2318.9
  Bottom Layer w20: v1@977.48,2334.44 978.35,2333.58 v1(978.35,2332.68) v1(1000,2332.68) 1000,2353.23 v1(1001.1,2354.33) v1(977.48,2354.33) v1@977.48,2334.44
  other v3: 1024.72,2090.55 1024.72,2126.15
NetC7_1: C7.1 U1.19 | length 77
  Top Layer w10: v1(851.5,2370.08) 863.21,2381.79 U1.19@881.61,2381.79
  Bottom Layer w10: v1(851.5,2370.08) 853,2371.58 875.58,2371.58 C7.1@881.02,2366.14 ; C7.1@876.26,2370.08 C7.1@883.07,2376.89
NetC7_2: C7.2 L1.2 U1.26 | length 624.4
  Top Layer w10: v1(932.2,2333.25) 932.2,2331.94 936.06,2328.08 936.06,2300.18 U1.26@937.13,2299.11
  Signal Layer 2 w20: 886.93,2217.75 910.55,2241.37 v1(910.55,2334.07) 931.38,2334.07 v1(932.2,2333.25) ; 910.55,2248.03 924.33,2261.81 924.33,2325.37 v1(932.2,2333.25) ; v1@910.55,2335.05 v1(910.55,2354.33) v1(932.2,2354.33) v1(932.2,2333.25)
  Signal Layer 2 w30: v3(886.93,2055.12) v3(886.93,2090.55) v3(886.93,2126.01) 886.93,2217.75
  Bottom Layer w10: C7.2@881.02,2318.9 896.77,2334.65 897.35,2334.07 v1(910.55,2334.07)
  Bottom Layer w20: v1(910.55,2334.07) 931.38,2334.07 v1(932.2,2333.25) v1(932.2,2354.33) v1(910.55,2354.33) v1(910.55,2334.07)
NetC22_1: C22.1 U1.24 | length 87.7
  Top Layer w10: v1(858.27,2283.46) 858.92,2284.11 876.63,2284.11 884.81,2292.29 884.81,2300.23 883.86,2301.18
  Bottom Layer w10: C22.1@821.97,2305.12 828.78,2298.31 828.78,2293.26 838.57,2283.46 v1(858.27,2283.46)
NetC25_1: C25.1 U3.1 | length 129.4
  Top Layer w20: U3.1@658.66,1421.97 694.17,1421.97 725.65,1390.49 C25.1@725.65,1341.09
NetC25_2: C25.2 D2.1 L2.1 U3.8 | length 493.1
  Top Layer w20: U3.8@658.66,1215.28 658.78,1215.28 659.49,1214.57 713.93,1214.57 725.65,1226.28 C25.2@725.65,1293.85
  Bottom Layer w10: D2.1@771.65,1184.31 1111.48,1184.31 L2.1@1121.06,1193.9
  other v1: 712.6,1261.81 736.22,1261.81 761.81,1261.81 761.81,1293.31
NetC32_1: C32.1 C34.1 U3.6 | length 164.6
  Top Layer w10: U3.6@558.66,1215.28 564.49,1209.45 564.49,1181.57 568.9,1177.17 v1(578.74,1177.17)
  Bottom Layer w10: C32.1@552.69,1204.72 C32.1@552.69,1203.26 ; C34.1@553.15,1261.81 553.15,1206.69 C32.1@551.18,1204.72 C32.1@552.69,1203.26 ; C32.1@553.89,1195.11 555.41,1200.63 C32.1@552.69,1203.26 ; v1(578.74,1177.17) 570.97,1177.17 552.69,1195.44 C32.1@552.69,1203.26
NetC32_2: C32.2 R17.2 | length 65.9
  Bottom Layer w10: C32.2@551.18,1141.73 R17.2@617.13,1141.73
NetC33_1: C33.1 U3.4 | length 86.7
  Top Layer w10: v1(466.54,1409.45) 479.05,1421.97 U3.4@508.66,1421.97
  Bottom Layer w10: C33.1@466.54,1370.08 v1(466.54,1409.45)
NetC44_1: C44.1 C45.2 C46.2 C47.2 C48.2 J6.A4 J6.A9 J6.B4 J6.B9 L3.1 U6.4 U6.5 U6.6 | length 961.1
  Top Layer w10: J6.B4@239.17,1796.26 269.92,1796.26 279.45,1786.73 301.85,1786.73 J6.A9@302.17,1786.42 317.29,1786.42 413.43,1786.42 419.29,1792.28 419.29,1864.17 453.82,1898.7 456.77,1898.7 457.68,1899.61 U6.5@457.68,1902.56 ; J6.B9@239.17,1894.69 269.92,1894.69 279.45,1885.16 301.85,1885.16 J6.A4@302.17,1884.84 417.32,1884.84 432.09,1899.61 U6.4@432.09,1902.56 453.82,1902.56 U6.5@457.68,1902.56 ; 861.57,1913.39 848.78,1900.59 C44.1@752.95,1900.59 745.08,1908.46 C48.2@693.9,1908.46 C47.2@644.68,1908.46 C46.2@595.47,1908.46 C45.2@546.26,1908.46 540.35,1902.56 U6.6@483.27,1902.56 U6.5@457.68,1902.56
NetD1_1: D1.1 R2.1 | length 119.8
  Top Layer w10: D1.1@1498.03,2766.73 1499.02,2767.72 1527.56,2767.72 1537.4,2757.87 v1(1537.4,2740.16)
  Bottom Layer w10: R2.1@1500.98,2712.6 1527.56,2712.6 1537.4,2722.44 v1(1537.4,2740.16)
NetJ3_5: J3.5 R11.1 | length 489.2
  Bottom Layer w20: J3.5@1869.09,2757.68 1920.91,2705.87 1920.91,2505.55 1893.7,2478.35 R11.1@1893.7,2301.18
NetJ5_1: J5.1 R26.2 | length 85
  Top Layer w10: v1(1452.76,586.61) 1497.58,586.61 J5.1@1504.54,593.58
  Bottom Layer w10: v1(1452.76,586.61) R26.2@1452.76,616.93
NetJ5_2: J5.2 J5.10 R29.2 | length 712.5
  Top Layer w10: J5.2@1504.54,788.46 1502.06,785.98 1502.06,710.53 1511.81,700.79 1895.67,700.79 1905.42,710.53 1905.42,787.59 J5.10@1904.54,788.46 1905.51,789.43 v1(1905.51,901.57)
  Bottom Layer w10: v1(1905.51,901.57) R29.2@1905.51,931.89
NetJ5_3: J5.3 R27.2 | length 84.6
  Top Layer w6: v1(1553.15,586.61) 1597.58,586.61 J5.3@1604.54,593.58
  Bottom Layer w10: v1(1553.15,586.61) R27.2@1553.15,616.93
NetJP1_2: JP1.2 R8.2 | length 398.4
  Top Layer w10: JP1.2@1064.96,3161.22 1123.82,3102.36 R8.2@1438.98,3102.36
NetJP2_2: JP2.2 R9.2 | length 350.8
  Top Layer w10: JP2.2@1195.87,3161.22 1195.87,3156.5 1230.67,3121.69 1387.64,3121.69 1405.71,3139.76 1467.52,3139.76 1503.94,3103.35 R9.2@1503.94,3102.36
NetJP3_2: JP3.2 R10.2 | length 267.1
  Top Layer w10: JP3.2@1326.77,3161.22 1511.02,3161.22 1568.9,3103.35 R10.2@1568.9,3102.36
NetJP4_2: JP4.2 R7.2 | length 230.7
  Bottom Layer w10: R7.2@659.45,3094.49 663.39,3094.49 697.64,3060.24 JP4.2@875.98,3060.24
NetR1_2: R1.2 U1.18 | length 281.9
  Top Layer w10: v1(816.06,2427.17) 816.06,2424.09 841.87,2398.29 880.28,2398.29 U1.18@881.02,2397.54
  Bottom Layer w10: R1.2@645.67,2374.02 767.72,2374.02 789.37,2395.67 789.37,2413.29 789.32,2413.34 803.15,2427.17 v1(816.06,2427.17)
NetR12_1: R12.1 R14.2 | length 516.5
  Bottom Layer w10: R14.2@427.17,1141.73 392.72,1176.18 392.72,1575.79 R12.1@440.94,1624.02
NetR13_1: R13.1 R15.2 U3.3 | length 192.6
  Top Layer w10: U3.3@558.66,1421.97 558.66,1466.14 v1(568.9,1476.38)
  Bottom Layer w10: R13.1@464.57,1542.32 465.55,1542.32 479.25,1528.62 479.25,1524.68 526.57,1477.36 R15.2@527.56,1477.36 528.54,1476.38 v1(568.9,1476.38)
NetR14_1: R14.1 R16.2 U3.5 | length 179
  Top Layer w10: v1(477.85,1212.6) 478.73,1213.47 506.86,1213.47 U3.5@508.66,1215.28
  Bottom Layer w10: R16.2@427.17,1261.81 428.15,1261.81 477.36,1212.6 v1(477.85,1212.6) 477.85,1209.89 490.16,1197.59 R14.1@490.16,1141.73
NetR28_2: R28.2 U5.C | length 66
  Top Layer w10: v1@1364.57,1541.73 v1(1364.17,1541.34) 1364.17,1581.82 U5.C@1364.96,1582.6
  Bottom Layer w10: v1(1364.17,1541.34) 1364.67,1540.85 1364.67,1518.41 R28.2@1365.16,1517.91
NetR30_2: R30.2 U5.1 | length 87.4
  Top Layer w10: U5.1@1314.96,1368.04 v1(1314.96,1411.42)
  Bottom Layer w10: v1(1314.96,1411.42) 1314.96,1413.39 1335.31,1433.74 1343.19,1433.74 1346.46,1437.01 R30.2@1346.46,1437.8
NetR31_2: R31.2 U5.2 | length 76.5
  Top Layer w10: U5.2@1364.96,1368.04 1366.14,1369.22 1366.14,1399.61 1378.94,1412.4 v1(1380.91,1412.4)
  Bottom Layer w10: v1@1380.41,1412.89 R31.2@1380.41,1437.3
NetR32_2: R32.2 U5.3 | length 69.9
  Top Layer w10: U5.3@1414.96,1368.04 1415.05,1368.13 1415.05,1411.13 v1(1415.14,1411.22)
  Bottom Layer w10: v1(1415.14,1411.22) 1415.25,1411.33 1415.25,1437.69 R32.2@1415.35,1437.8
NetU4_15: U4.15 U4.30 U4.40 | length 233.7
  Top Layer w10: U4.30@1225.2,1830.89 1248.04,1830.89 U4.40@1277.96,1860.81 ; U4.40@1260.05,1842.9 U4.40@1277.96,1860.81 ; U4.15@1374.81,1830.89 1351.98,1830.89 ; U4.40@1277.96,1860.81 v2(1279.93,1860.81) U4.40@1300.01,1860.81 v2(1320.09,1860.81) 1322.06,1860.81 1351.98,1830.89 ; 1351.98,1830.89 1339.97,1842.9 1351.98,1830.89
  other v2: 1259.85,1843.09 1300.01,1843.09 1340.17,1843.09 1259.85,1878.53 1300.01,1878.53 1340.17,1878.53
P3V3: C24.2 C35.1 R11.2 U2.5 U4.38 | length 1869
  Top Layer w10: C35.1@1187.01,1686.69 1189.51,1689.19 1203.74,1689.19 1219.46,1704.91 U4.38@1225.2,1704.91
  Top Layer w20: C35.1@1187.01,1685.04 1187.01,1411.42 1325.85,1272.58 1354.49,1272.58 U2.5@1356.3,1270.76 ; U2.5@1358.11,1270.76 1412.57,1270.76 C24.2@1419.46,1263.87 1655.61,1263.87 1805.12,1413.39 1805.12,1742.13 1893.7,1830.71 v1(1893.7,2131.89)
  Bottom Layer w20: v1(1893.7,2131.89) R11.2@1893.7,2187.01
PMID: C8.2 C9.2 C10.2 C11.1 U1.29 | length 238.5
  Top Layer w10: U1.29@990.28,2298.13 991.18,2297.22 991.18,2275.67 1017.91,2248.94 1017.91,2246.97 1023.74,2241.14 1070.98,2241.14 C10.2@1078.86,2233.27 C9.2@1133.98,2233.27 C8.2@1188.11,2233.27
PP5V: C23.2 C26.1 C27.1 C28.1 L2.2 R12.2 U2.1 U2.3 U4.34 U4.35 U4.@1225.2,1760.02 | length 1669.2
  Top Layer w10: C28.1@1011.81,1369.09 1012.2,1369.49 1012.2,1494.09 981.22,1525.08 981.22,1567.83 v1(982.28,1568.9) 982.28,1599.02 978.35,1602.95 C26.1@1012.2,1636.81 ; C26.1@1028.94,1620.08 C26.1@1012.2,1636.81 ; U4.@1225.2,1760.02 1074.98,1760.02 1012.2,1697.24 C26.1@1012.2,1636.81 ; v1(1248.03,1165.35) U2.3@1248.03,1195.96 ; U2.1@1248.03,1270.76 1248.2,1270.93 1285.9,1270.93 v1(1286.06,1271.1)
  Top Layer w20: C28.1@1011.81,1369.09 1011.81,1342.36 1027.4,1326.77 1064.96,1326.77 1122.05,1269.69 1179.23,1269.69 C23.2@1184.05,1264.86 1188.88,1269.68 1246.95,1269.68 U2.1@1248.03,1270.76
  Signal Layer 2 w6: v1(522.86,1620.08) 574.04,1568.9 v1(982.28,1568.9)
  Signal Layer 2 w10: v1(1248.03,1165.35) 1287.4,1165.35 1299.21,1177.17 1299.21,1257.87 1286.06,1271.02 v1(1286.06,1271.1)
  Bottom Layer w6: R12.2@478.35,1622.05 480.31,1620.08 482.28,1622.05 484.25,1620.08 v1(522.86,1620.08)
  other v1: 1051.18,1460.63 1074.8,1460.63 1098.43,1460.63 1051.18,1482.28 1074.8,1482.28 1098.43,1482.28 1005.91,1568.9 1029.53,1568.9
PPHV: C2.2 C3.2 C4.2 C5.2 C6.1 C38.1 C39.1 C40.1 TP1.1 U1.2 U1.3 U1.8 U1.9 U4.20 U4.21 U4.22 U4.@1326.64,1913.57 | length 1633.6
  Top Layer w6: 1028.66,2429.13 1029.65,2428.15 ; U1.2@1029.65,2318.8 1029.65,2326.77 U1.3@1029.65,2334.55 ; v1(1068.9,2301.18) 1088.7,2301.18 1107.4,2319.88 C6.1@1100.51,2326.77
  Top Layer w10: 1010.94,2432.11 1010.94,2450.79 ; U1.9@1010.94,2442.32 1010.94,2450.79 ; U1.8@1029.65,2415.35 1029.65,2428.15 ; 1032.6,2326.77 1055.5,2326.77 1055.81,2326.46 1072.38,2326.46 1072.69,2326.77 C6.1@1100.51,2326.77 1144.8,2326.77 C5.2@1148.74,2330.71 C4.2@1202.87,2330.71 C3.2@1257.01,2330.71 1311.14,2330.71 1342.69,2299.16 1342.69,2129.85 1340.88,2128.04 1340.88,2043.07 1342.69,2041.26 1341.17,2039.75 1341.17,1984.87 1327.97,1971.67 1327.97,1952.04 1326.64,1950.71 U4.@1326.64,1913.57 ; v1(1046.38,2486.22) 1010.94,2450.79
  Signal Layer 2 w6: v1(1046.38,2486.22) 1082.09,2450.5 1082.09,2314.38 v1(1068.9,2301.18)
  Bottom Layer w6: v1(1068.9,2301.18) 1153.54,2385.83 1153.54,2767.38 1135.83,2785.09 TP1.1@1135.83,2805.12
PROG: JP1.1 JP2.1 JP3.1 U1.20 | length 1073.5
  Top Layer w6: U1.20@880.04,2366.04 896.81,2366.04 903.3,2372.53 903.3,2402.87 912.35,2411.92 v1(912.35,2413.56)
  Bottom Layer w10: v1(912.35,2413.56) 875.98,2449.92 875.98,2872.24 JP1.1@1064.96,3061.22 JP2.1@1195.87,3061.22 JP3.1@1326.77,3061.22
REGN: C18.1 R3.2 R4.2 U1.5 | length 752.8
  Top Layer w10: U1.5@1029.65,2366.04 1051.31,2366.04 1076.97,2391.7 1076.97,2436.1 1090.67,2449.8 C18.1@1091.65,2449.8 1091.65,2571.73 v1(1088.58,2574.8)
  Signal Layer 2 w10: v1(712.6,2555.12) 714.57,2555.12 734.25,2574.8 v1(1088.58,2574.8)
  Bottom Layer w10: R4.2@710.68,2514.76 R4.2@710.68,2513.78 ; v1(712.6,2555.12) 712.6,2519.63 714.57,2517.66 R4.2@710.68,2513.78 ; R3.2@771.77,2480.31 745.2,2480.31 725.43,2500.08 724.38,2500.08 R4.2@710.68,2513.78
STAT: D1.2 U1.1 | length 1022.6
  Top Layer w10: 1034.63,2301.12 1036.55,2299.2 v1(1036.55,2281.53) ; v1(1469.84,2826.13) 1494.73,2826.13 D1.2@1498.03,2822.83
  Signal Layer 2 w10: v1(1036.55,2281.53) 1038.46,2279.62 1045.53,2279.62 1045.63,2279.53 1448.23,2279.53 1469.84,2301.13 v1@1469.84,2830.71
SYS: C12.1 C13.1 C14.1 C15.1 C16.1 C17.1 C29.1 C30.1 C31.1 J1.1 R13.2 U1.25 U3.2 | length 1655.4
  Top Layer w10: J1.1@171.26,2389.37 205.63,2355 205.63,2347.52 324.8,2228.35 381.99,2228.35 382.34,2227.99 499.13,2227.99 513.31,2227.99 543.31,2227.99 v1@579.84,2227.99 ; 570.87,1696.85 C29.1@624.02,1696.85 ; v1@573.31,2227.99 v1@579.84,2227.99 ; U3.2@608.66,1421.97 608.66,1481.23 C31.1@624.19,1496.75 624.02,1496.92 C30.1@624.02,1598.43 ; C30.1@620.08,1602.36 C30.1@624.02,1598.43 ; C29.1@624.02,1722.44 C29.1@624.02,1696.85 ; U1.25@919.41,2299.11 918.5,2298.21 918.5,2275.67 894.72,2251.89 883.98,2241.14 833.15,2241.14 820,2227.99 739.29,2227.99 659.57,2227.99 v1@579.84,2227.99 ; C30.1@624.02,1598.43 C29.1@624.02,1696.85
  Bottom Layer w10: 513.91,1736.71 v1@513.91,1758.35 ; v1(519.69,1758.35) 545.28,1783.94 545.28,2086.79 ; R13.2@527.56,1542.32 528.54,1543.31 570.87,1543.31 v1(582.68,1531.5)
  other v1: 489.69,1698.35 519.69,1698.35 549.69,1698.35 489.69,1728.35 519.69,1728.35 549.69,1728.35 489.69,1758.35 549.69,1758.35 513.31,2202.28 543.31,2202.28 573.31,2202.28 848.43,2202.76 513.31,2232.28 543.31,2232.28 573.31,2232.28 616.14,2261.81 695.63,2261.9 513.31,2262.28 543.31,2262.28 573.31,2262.28 775.35,2263.17
TS: J4.1 JP4.1 R3.1 R5.2 U1.16 | length 1321.2
  Top Layer w10: v1(851.5,2480.32) 851.5,2477.61 863.31,2465.8 863.31,2436.83 871,2429.13 881.94,2429.13
  Bottom Layer w10: v1(851.5,2480.32) R3.1@819.02,2480.31 R5.2@819.02,2520.67 819.02,2887.91 968.5,3037.4 968.5,3131.89 940.16,3160.24 JP4.1@875.98,3160.24 875.98,3488.19 854.33,3509.84 854.33,3549.21 J4.1@852.36,3551.18